# Allegro board bba_ef.brd
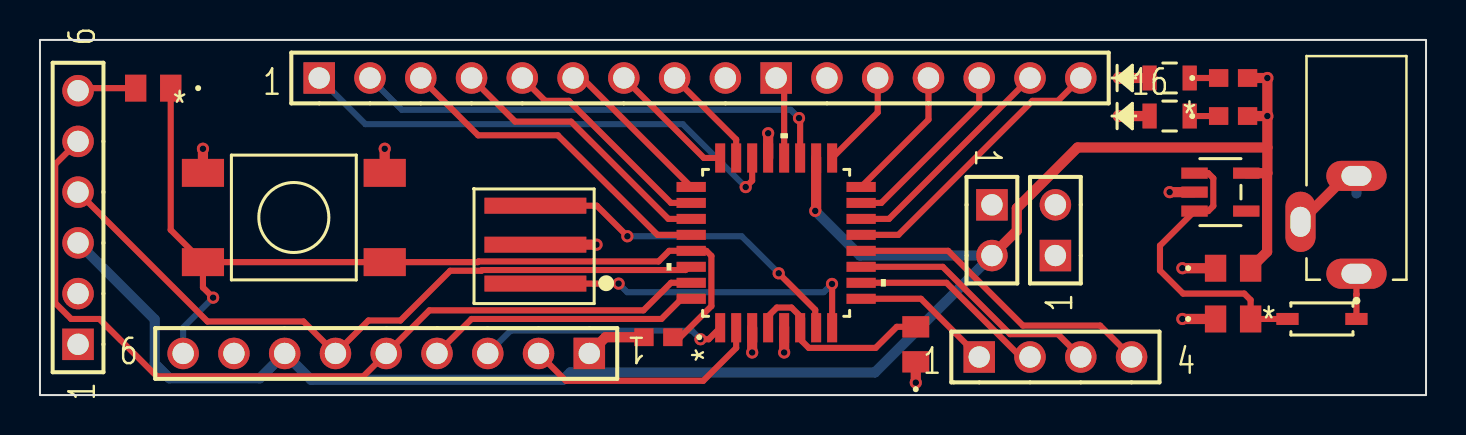
[diagram p0: board, top side]
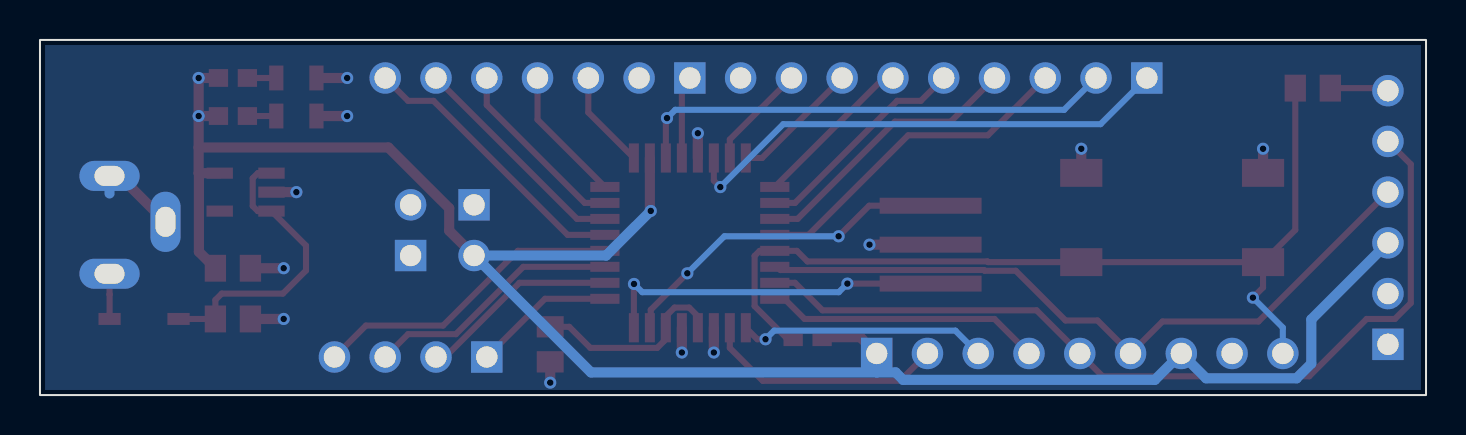
[diagram p1: board, bottom side, seen from below]

Outline 69.34 x 17.78 mm; copper layers: TOP, BOTTOM. Coordinates in mm from the lower left corner of the outline.
Outline path: rectangle 0,0 69.34,17.78

## Design rules (mm)
constraint set DEFAULT: min track width 0.305

## Placement (name value [footprint] x y rotation side)
C1  100 nF  [CAP_0805C]  59.69 3.81 0 top
C2  100 nF  [CAP_0805C]  59.69 6.35 0 top
C3  100 nF  [CAP_0805C]  5.66 15.37 180 top
C4  100 nF  [CAP_0805C]  43.81 2.54 90 top
D1  DIODE  [SOD123]  64.14 3.81 0 top
D2  LED GREEN  [LED0805N_CML]  56.52 13.97 0 top
D3  LED GREEN  [LED0805N_CML]  56.52 15.88 0 top
J1  CON2  [BLKCON100VHTM1SQSW1002]  47.62 9.52 270 top
J2  CON2  [BLKCON100VHTM1SQSW1002]  50.8 6.98 90 top
J3  CON6 R/A  [BLKCON100VHTM1SQSW1006]  1.91 2.54 90 top
J4  PJ-007  [SAMESKY_PJ-007]  65.86 10.97 180 top
J5  CON16  [BLKCON100VHTM1SQSW10016]  13.97 15.88 0 top
J6  CON9 R/A  [BLKCON100VHTM1SQSW1009]  27.48 2.08 180 top
J7  CON4 R/A  [BLKCON100VHTM1SQSW1004]  46.99 1.9 0 top
R1  1k  [STA_RNCP0603]  59.69 13.97 0 top
R2  1k  [STA_RNCP0603]  59.69 15.88 0 top
R3  10k  [STA_RNCP0603]  30.94 2.9 180 top
SW1  SWITCH SPST-NO  [SW4_FSM-5P23]  12.7 8.89 0 top
U1  LDO  [SOT-23-5_MC]  59.06 10.16 0 top
U2  IC MCU 32KB  [MA]  36.83 7.62 90 top
Y1  16.00 MHz  [3-SMD]  24.77 7.62 90 top

## Library data of the parts
C1-C4 = CAP CER 0.1uF 50V X7R 0805: User Part Number: PN; Tolerance: TOL
D1 = DIODE 100V 300MA SOD12: User Part Number: PN; Tolerance: TOL
D2 D3 = LED GREEN 0805 SMD: User Part Number: PN; Tolerance: TOL
J1 J2 = CONN HEADER VERT 2POS 2.54MM
J3 = CONN HEADER R/A 6POS 2.54MM
J4 = PJ-007
J5 = CONN HEADER VERT 16POS 2.54MM
J6 = CONN HEADER VERT 9POS 2.54MM
J7 = CONN HEADER VERT 4POS 2.54MM
R1 R2 = R 1K OHM 1% 1/8W 0603: User Part Number: PN; Tolerance: TOL
R3 = R 10K OHM 1% 1/8W 0603: User Part Number: PN; Tolerance: TOL
SW1 = SWITCH TACTILE SPST-NO 0.05A 24: User Part Number: PN; Tolerance: TOL
U1 = IC REG LINEAR 5V 300MA SOT23-5: User Part Number: PN; Tolerance: TOL
U2 = IC MCU 8BIT 32KB FLASH 32TQFP: User Part Number: PN; Tolerance: TOL
Y1 = RESONATOR 16.0MHZ 22PF SMD

## Footprints (pads in the part's own frame, mm; a bottom-side part is the same pattern mirrored in y, then rotated)
3-SMD
  rect 0.8x5.1 smd: 1(-2.04,-0.02) 2(-0.09,-0.02) 3(1.86,-0.02)
BLKCON100VHTM1SQSW1002
  rect 1.575x1.575 hole 1.067: 1(0,0)
  round 1.575 hole 1.067: 2(2.54,0)
BLKCON100VHTM1SQSW1004
  rect 1.575x1.575 hole 1.067: 1(0,0)
  round 1.575 hole 1.067: 2(2.54,0) 3(5.08,0) 4(7.62,0)
BLKCON100VHTM1SQSW1006
  rect 1.575x1.575 hole 1.067: 1(0,0)
  round 1.575 hole 1.067: 2(2.54,0) 3(5.08,0) 4(7.62,0) 5(10.16,0) 6(12.7,0)
BLKCON100VHTM1SQSW1009
  rect 1.575x1.575 hole 1.067: 1(0,0)
  round 1.575 hole 1.067: 2(2.54,0) 3(5.08,0) 4(7.62,0) 5(10.16,0) 6(12.7,0) 7(15.24,0) 8(17.78,0) 9(20.32,0)
BLKCON100VHTM1SQSW10016
  rect 1.575x1.575 hole 1.067: 1(0,0) 10(22.86,0)
  round 1.575 hole 1.067: 2(2.54,0) 3(5.08,0) 4(7.62,0) 5(10.16,0) 6(12.7,0) 7(15.24,0) 8(17.78,0) 9(20.32,0) 11(25.4,0) 12(27.94,0) 13(30.48,0) 14(33.02,0) 15(35.56,0) 16(38.1,0)
CAP_0805C
  rect 1.067x1.346 smd: 1(-0.876,0) 2(0.876,0)
LED0805N_CML
  rect 0.711x1.245 smd: 1(-1.003,0) 2(1.003,0)
MA
  rect 1.461x0.501 smd: 1(-4.25,2.8) 2(-4.25,2) 3(-4.25,1.2) 4(-4.25,0.4) 5(-4.25,-0.4) 6(-4.25,-1.2) 7(-4.25,-2) 8(-4.25,-2.8) 17(4.25,-2.8) 18(4.25,-2) 19(4.25,-1.2) 20(4.25,-0.4) 21(4.25,0.4) 22(4.25,1.2) 23(4.25,2) 24(4.25,2.8)
  rect 0.501x1.461 smd: 9(-2.8,-4.25) 10(-2,-4.25) 11(-1.2,-4.25) 12(-0.4,-4.25) 13(0.4,-4.25) 14(1.2,-4.25) 15(2,-4.25) 16(2.8,-4.25) 25(2.8,4.25) 26(2,4.25) 27(1.2,4.25) 28(0.4,4.25) 29(-0.4,4.25) 30(-1.2,4.25) 31(-2,4.25) 32(-2.8,4.25)
SAMESKY_PJ-007
  oval 3.016x1.508 hole 1.5x1: 1(0,4.9) 2(0,0)
  oval 1.508x3.016 hole 1x1.5: 3(2.8,2.3)
SOD123
  rect 1.111x0.601 smd: 1(-1.725,0) 2(1.725,0)
SOT-23-5_MC
  rect 1.321x0.559 smd: 1(-1.295,0.95) 2(-1.295,0) 3(-1.295,-0.95) 4(1.295,-0.95) 5(1.295,0.95)
STA_RNCP0603
  rect 0.965x0.889 smd: 1(-0.724,0) 2(0.724,0)
SW4_FSM-5P23
  rect 2.108x1.397 smd: 1(-4.547,2.235) 2(4.547,2.235) 3(-4.547,-2.235) 4(4.547,-2.235)

## Nets
+5.0V: C2.2 J1.2 J3.3 J6.1 J6.7 R1.2 R2.2 R3.2 U1.5 U2.18
GND: C1.1 C2.1 C4.1 D2.1(CATHODE) D3.1(CATHODE) J1.1 J2.2 J3.1 J4.2 J4.3 J5.9 J5.11 J6.8 SW1.1 SW1.2 U1.2 U2.3 U2.5 U2.21 Y1.2
+JACK: J2.1
A0: J5.8 U2.23
A1: J5.7 U2.24
A2: J5.6 U2.25
A3: J5.5 U2.26
A4: J5.4 U2.27
A5: J5.3 U2.28
A6: J5.2 U2.19
A7: J5.1 U2.22
AREF: J5.10 U2.20
D2: J6.4 U2.32
D3: J6.3 U2.1
D4: J6.2 U2.2
D8: J7.4 U2.12
D9: J5.16 U2.13
D10: J5.15 U2.14
D11: J5.14 U2.15
D12: J5.13 U2.16
D13: J5.12 U2.17
EXT_RESET: C3.2 J3.6
N_6: J3.2
RST: C3.1 J6.9 R3.1 SW1.3 SW1.4 U2.29
RX: J3.4 J6.6 U2.30
TX: J3.5 J6.5 U2.31
XTAL1_OUT: U2.7 Y1.3(OUTPUT)
XTAL2_IN: U2.8 Y1.1
N00514: D1.2 J4.1
N00521: C1.2 D1.1 U1.1 U1.3(\S\H\D\N\)
N09752: D3.2 R2.1
N09779: D2.2 R1.1
N12318: J7.1 U2.9
N12322: J7.2 U2.10
N12326: J7.3 U2.11
N12932: C4.2 U2.4 U2.6(VCC_2)

Pads without a net: U1 4

## Via types
v1: diameter 0.61, hole 0.33, TOP to BOTTOM, 23 vias

## Routing (per net, layer and track width the routed paths; a pad name or vN(x,y) marks a point on that pad's centre or on a via; arc(x,y) is an arc through that point)
+5.0V: length 99.5
  TOP w0.508: 61.39,11.11 61.39,7.18 C2.2 ; 61.39,11.11 U1.5 ; 61.39,11.11 61.4,11.11 61.4,12.4 ; R2.2 v1(61.4,15.88) v1(61.4,13.97) ; v1(61.4,13.97) 61.4,12.4 ; v1(61.4,13.97) R1.2 ; U2.18 38.83,9.26 v1(38.79,9.22) ; R3.2 28.3,2.9 J6.1 ; 61.4,12.4 51.91,12.4 48.87,9.35 48.87,8.23 J1.2
  BOTTOM w0.508: J3.3 5.74,3.78 5.74,1.57 6.48,0.84 11,0.84 J6.7 13.56,0.76 26.16,0.76 26.53,1.13 27.48,1.13 ; v1(38.79,9.22) 41.02,6.98 J1.2 41.77,1.13 27.48,1.13 ; 27.48,1.13 J6.1
GND: length 22.5
  TOP w0.508: C4.1 v1(43.81,0.62) ; SW1.2 v1(17.25,12.33) ; D3.1 v1(53.98,15.88) ; U2.5 v1(37.23,2.13) ; J4.2 65.36,10.97 J4.3 ; SW1.1 v1(8.15,12.33) ; U2.3 v1(35.63,2.13) ; D2.1 v1(53.98,13.97) ; C1.1 v1(57.15,3.81) ; U1.2 v1(56.52,10.16) ; U2.21 v1(36.43,13.11) ; C2.1 v1(57.15,6.35) ; Y1.2 v1(27.84,7.53)
  BOTTOM w0.508: 65.86,10.1 J4.2
A0: length 5.3
  TOP w0.305: U2.23 34.83,12.79 J5.8
A1: length 6.5
  TOP w0.305: U2.24 33.21,11.87 J5.7
A2: length 8.2
  TOP w0.305: J5.6 27.12,15.88 U2.25
A3: length 11
  TOP w0.305: J5.5 25.27,14.73 26.46,14.73 31.57,9.62 U2.26
A4: length 13.9
  TOP w0.305: U2.27 31.44,8.82 26.57,13.69 23.77,13.69 J5.4
A5: length 16.8
  TOP w0.305: U2.28 30.89,8.02 25.91,13 21.92,13 J5.3
A6: length 24.3
  TOP w0.305: U2.19 38.03,13.81 v1(37.97,13.87)
  BOTTOM w0.305: J5.2 18.1,14.28 37.56,14.28 v1(37.97,13.87)
A7: length 25.2
  TOP w0.305: v1(35.31,10.41) 35.63,10.74 U2.22
  BOTTOM w0.305: v1(35.31,10.41) 32.16,13.56 16.28,13.56 J5.1
AREF: length 4.2
  TOP w0.305: U2.20 37.23,15.48 J5.10
D2: length 13.9
  TOP w0.305: J6.4 21.59,3.81 31.09,3.81 32.1,4.82 U2.32
D3: length 12.5
  TOP w0.305: U2.1 33.45,2.79 v1(33.05,2.79)
  BOTTOM w0.305: v1(33.05,2.79) 32.61,3.23 23.55,3.23 J6.3
D4: length 12.1
  TOP w0.305: U2.2 34.83,2.36 33.18,0.71 26.31,0.71 J6.2
D8: length 15.7
  TOP w0.305: J7.4 53.04,3.48 49.17,3.48 45.43,7.22 U2.12
D9: length 14.2
  TOP w0.305: U2.13 42.95,8.02 49.66,14.73 50.93,14.73 J5.16
D10: length 11.4
  TOP w0.305: U2.14 42.47,8.82 J5.15
D11: length 9.3
  TOP w0.305: U2.15 42.09,9.62 46.99,14.52 J5.14
D12: length 6.9
  TOP w0.305: U2.16 44.45,13.79 J5.13
D13: length 4.9
  TOP w0.305: U2.17 41.91,14.15 J5.12
EXT_RESET: length 2.9
  TOP w0.305: C3.2 2.03,15.37 J3.6
RST: length 45.6
  TOP w0.305: SW1.3 8.15,5.38 v1(8.66,4.88) ; SW1.3 SW1.4 21.9,6.65 21.94,6.69 30.95,6.69 31.48,7.22 U2.29 33.34,7.22 33.59,6.97 33.59,4.45 32.03,2.9 R3.1 ; SW1.3 6.54,8.27 C3.1
  BOTTOM w0.305: v1(8.66,4.88) 7.16,3.38 J6.9
RX: length 35.8
  TOP w0.305: J3.4 8.38,3.68 13.18,3.68 J6.6 16.43,3.73 18.03,3.73 20.52,6.22 22.08,6.22 22.12,6.26 32.3,6.26 32.46,6.42 U2.30
TX: length 43.8
  TOP w0.305: U2.31 31.57,5.62 30.19,4.24 19.48,4.24 J6.5 16.18,0.94 5.84,0.94 2.97,3.81 1.56,3.81 0.76,4.61 0.76,11.56 J3.5
XTAL1_OUT: length 17.1
  TOP w0.305: v1(29.39,7.95) 27.86,9.48 Y1.3 ; v1(36.96,6.1) 38.79,4.27 38.79,3.41 U2.7
  BOTTOM w0.305: v1(36.96,6.1) 35.1,7.95 v1(29.39,7.95)
XTAL2_IN: length 17.4
  TOP w0.305: v1(39.62,5.56) 39.63,5.56 U2.8 ; Y1.1 v1(28.95,5.58)
  BOTTOM w0.305: v1(28.95,5.58) 29.38,5.15 39.21,5.15 v1(39.62,5.56)
N00514: length 2.3
  TOP w0.305: D1.2 65.86,5.04 65.86,5.04 J4.1
N00521: length 15.1
  TOP w0.305: U1.1 58.45,11.11 58.7,10.86 58.7,9.46 58.45,9.21 U1.3 56.03,7.48 56.03,6.24 57.19,5.08 60.25,5.08 60.57,4.76 C1.2 D1.1
N09752: length 1.4
  TOP w0.305: R2.1 D3.2
N09779: length 1.4
  TOP w0.305: R1.1 D2.2
N12318: length 7.1
  TOP w0.305: U2.9 44.07,4.82 J7.1
N12322: length 10
  TOP w0.305: U2.10 45.35,5.62 49.07,1.9 J7.2
N12326: length 12.9
  TOP w0.305: U2.11 45.16,6.42 48.54,3.05 50.93,3.05 J7.3
N12932: length 10.6
  TOP w0.305: 38.03,3.85 38.03,3.95 37.6,4.38 36.86,4.38 36.43,3.95 U2.4 ; 38.03,3.85 U2.6 ; 38.03,3.85 38.13,3.85 38.13,2.7 38.46,2.36 41.81,2.36 42.86,3.42 C4.2

## Copper pours and planes (outline as drawn; the poured copper is in the pictures)
GND on BOTTOM: 0.25,17.53 69.09,17.53 69.09,0.25 0.25,0.25

## Text on the board
XSECTION_CHART: *  SURFACE | L1 TOP CONDUCTOR | *  DIELECTRIC | L2 BOTTOM CONDUCTOR | DESIGN CROSS SECTION CHART | ___________________________ | TOTAL THICKNESS 10.4 MIL | 1-2
USER_PART_NUM_TOP: FIGURE | FINISHED_SIZE | 13.0 | 42.0 | 59.055x39.37 | DRILLED_SIZE | - | DRILL CHART: TOP to BOTTOM | ALL UNITS ARE IN MILS | ROTATION | 0.000 | 90.000 | PLATED | QTY | 23 | 39 | 2 | 1
